# Altium PCB PCI Express Mini L1_V1.PCBDOC (part 5 of 9)
Units mm, origin at the board's own origin, x right, y up, seen from the top; angles counter-clockwise.
Board outline 70 x 83.2 mm, 6 copper layers (TopLayer, Layer 1, Layer 2, Layer 3, Layer 4, Bottom Layer), stack 0.914 mm thick; 442 components, 259 nets, 1412 pads, 857 vias.
Unrouted connection lines stored in the file: 2.
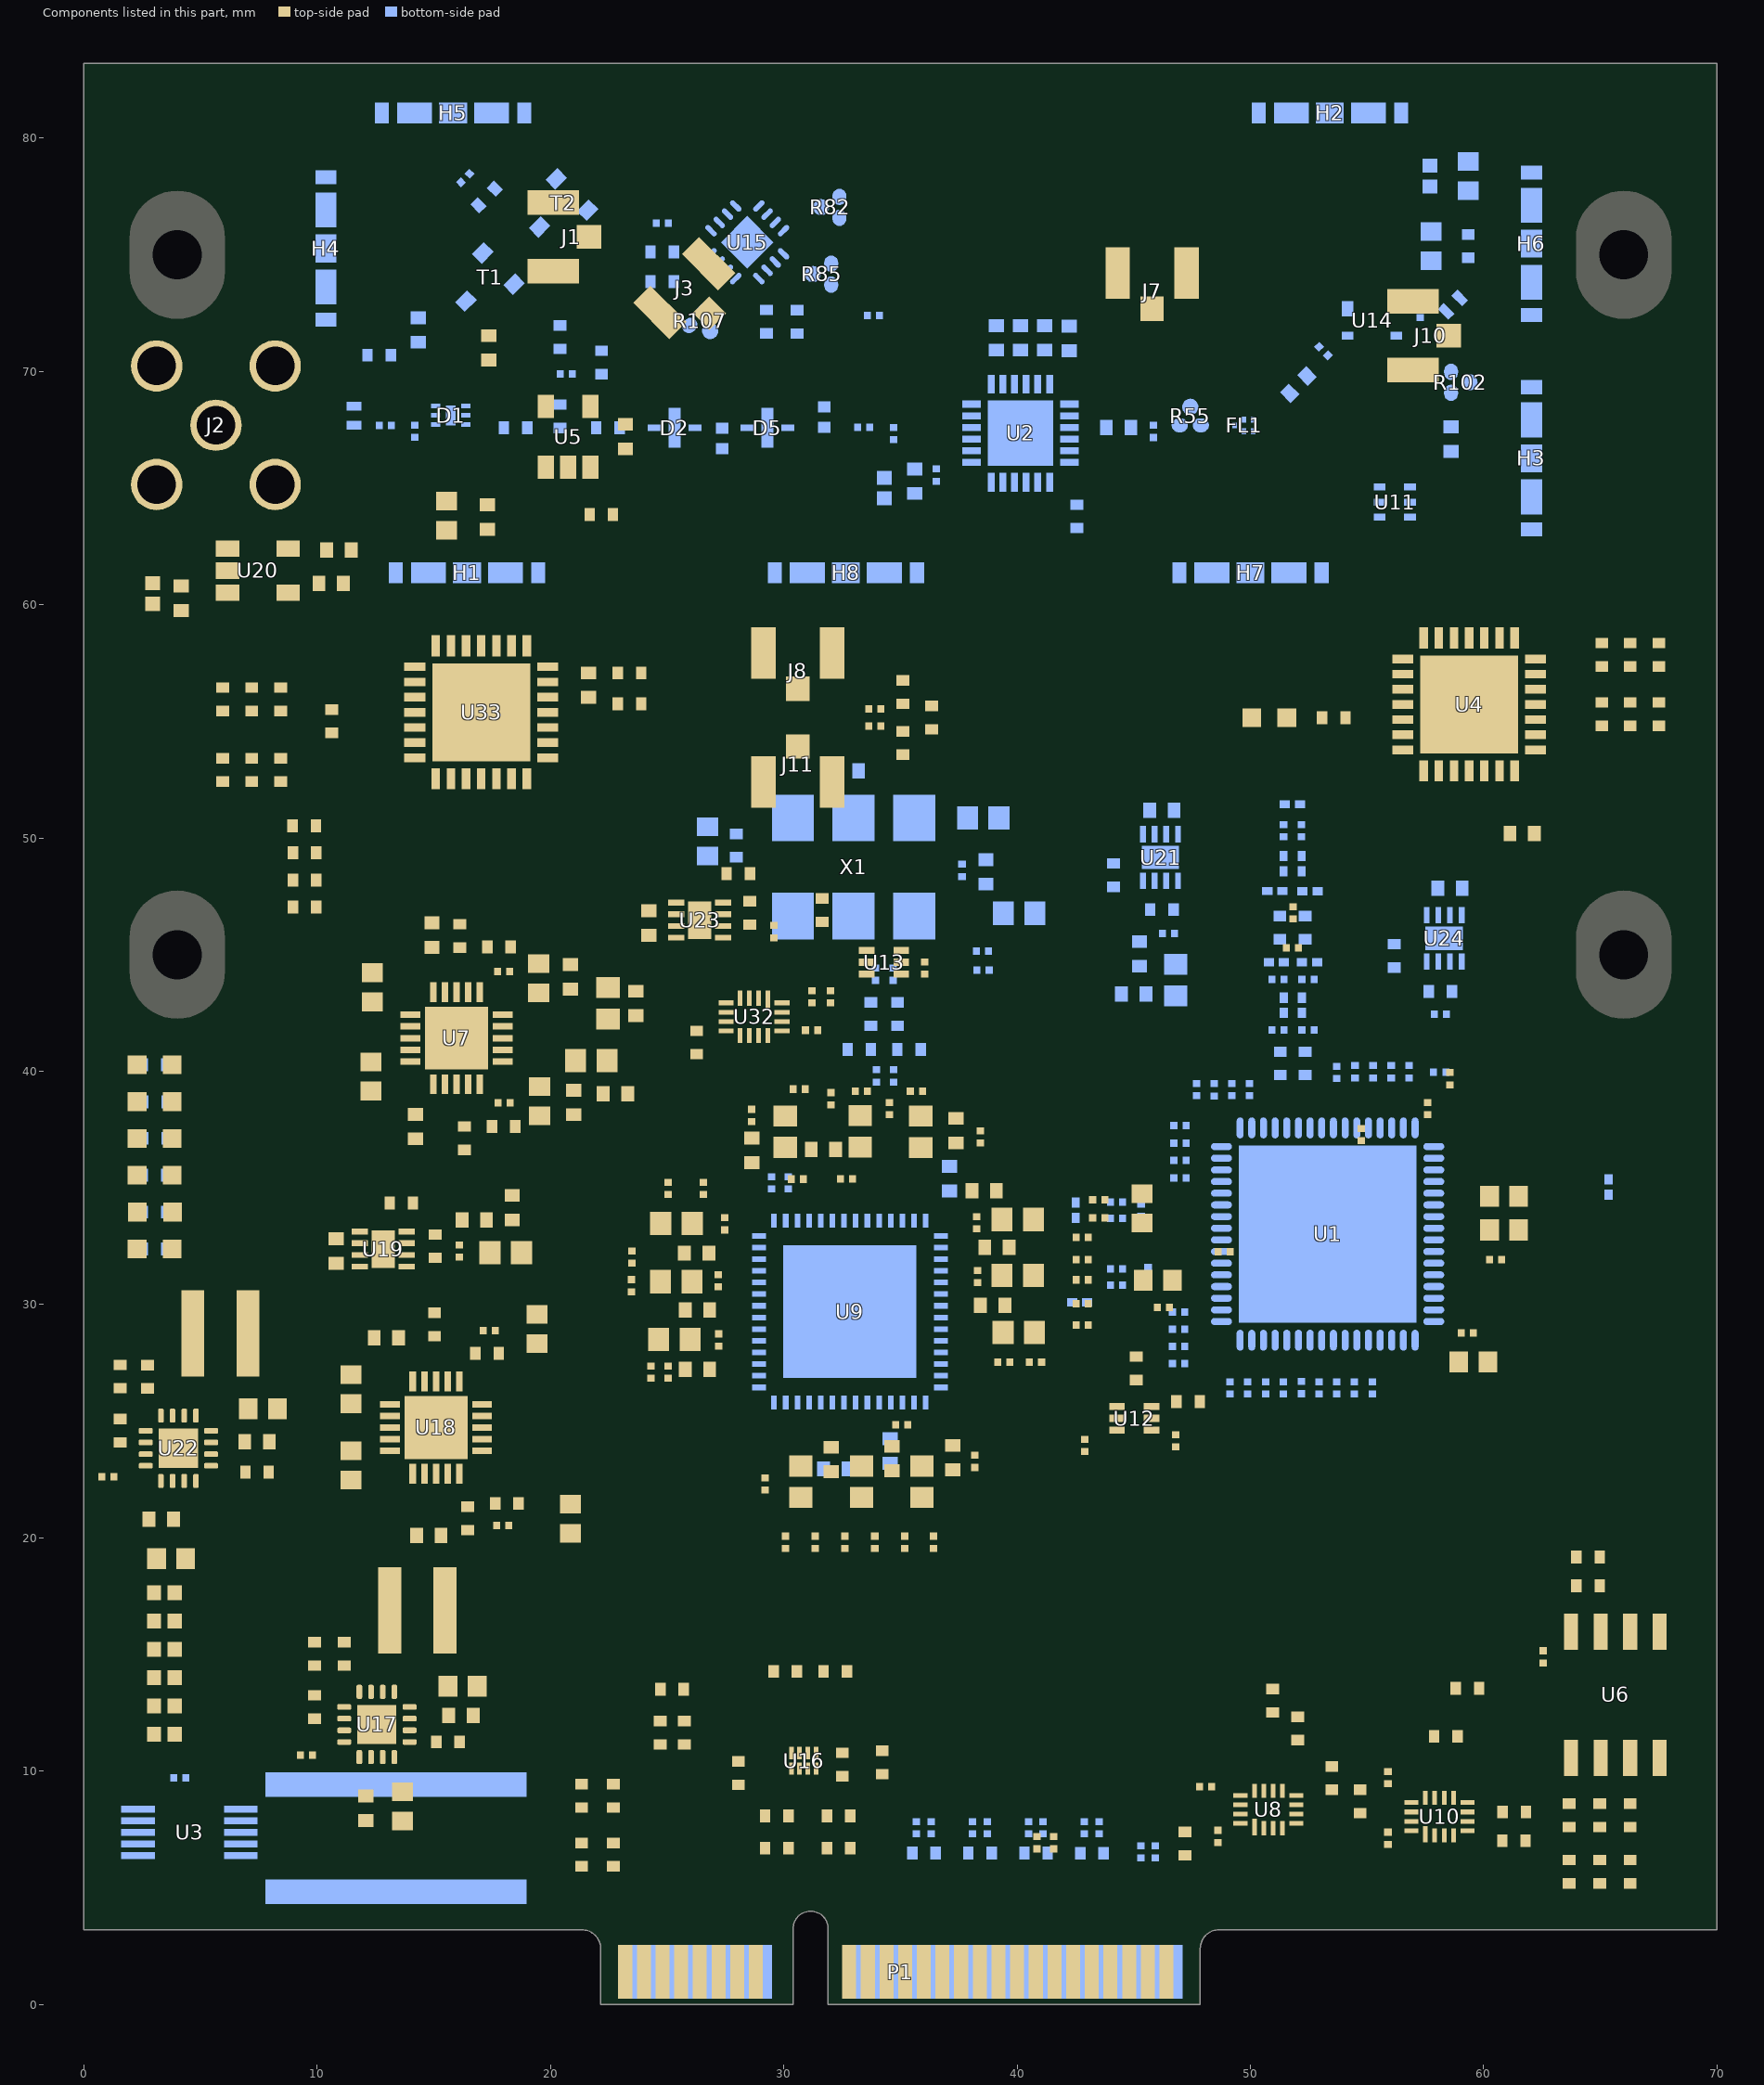
[diagram p6: the components of this part, seen from the top]

## Part data (continued)
R131: library part Resistor, "Res Thick Film 0402 48.7K Ohm 1% 1/16W 100ppm/C Molded SMD Paper T/R", Case Code (Imperial)=0402, Case Code (Metric)=1005, Manufacturer="Stackpole Electronics", Manufacturer Part Number=RMCF0402FT48K7, Max Operating Temperature=155°C, Max Power Dissipation=63mW, Min Operating Temperature=-55°C, Resistor Type="Thick Film", Supplier Part Number 1=RMCF0402FT48K7CT-ND, Temperature Coefficient=100ppm/°C, Tolerance=1%, Case/Package=0402, Category="Chip SMD Resistors", ComponentLink1Description=http://components.arrow.com/part/dataview/50597970S14177N1174?src-supplier=Arrow+Electronics, ComponentLink1URL=http://components.arrow.com/part/dataview/50597970S14177N1174?src-supplier=Arrow+Electronics, ComponentLink2Description=https://www.seielect.com/Catalog/SEI-RMCF_RMCP.pdf?src-supplier=Digi-Key, ComponentLink2URL=https://www.seielect.com/Catalog/SEI-RMCF_RMCP.pdf?src-supplier=Digi-Key, ComponentLink3Description=https://www.seielect.com/Catalog/SEI-RMCF_RMCP.pdf?src-supplier=Avnet, ComponentLink3URL=https://www.seielect.com/Catalog/SEI-RMCF_RMCP.pdf?src-supplier=Avnet, ComponentLink4Description=https://www.seielect.com/catalog/SEI-Packaging.pdf?src-supplier=Digi-Key, ComponentLink4URL=https://www.seielect.com/catalog/SEI-Packaging.pdf?src-supplier=Digi-Key, Contact Plating=Tin,Matte, Features="Automotive AEC-Q200", Height=0.016inch, Lead Free="Lead Free", Length=0.039inch, Mount="Surface Mount", Number of Terminations=2, Packaging="Tape and Reel", Pricing 1="1=0,10000, 10=0,01300, 100=0,00530, 1000=0,00239, 2500=0,00207, 5000=0,00171 (USD)", Resistance=48.7kR, RoHS=Yes, Stock 1=91344, Supplier 1=Digi-Key, Width=0.02inch
T1 T2: "Trans MOSFET N-CH 8V 6A 3-Pin SOT-23 T/R", Case/Package=SOT-23, Continuous Drain Current (ID)=6A, Drain to Source Voltage (Vdss)=8V, Gate to Source Voltage (Vgs)=5V, Input Capacitance=1.07nF, Manufacturer=Vishay, Max Operating Temperature=150°C, Max Power Dissipation=2.5W, Min Operating Temperature=-55°C, Package Quantity=3000, Power Dissipation=1.3W, Supplier Part Number 1=SI2342DS-T1-GE3CT-ND, Threshold Voltage=800mV, Category=MOSFETs, ComponentLink1Description=https://datasheet.ciiva.com/14905/si2342ds-14905257.pdf?src-supplier=Arrow, ComponentLink1URL=https://datasheet.ciiva.com/14905/si2342ds-14905257.pdf?src-supplier=Arrow, ComponentLink2Description=https://datasheet.ciiva.com/29746/si2342ds-29746581.pdf?src-supplier=Digi-Key, ComponentLink2URL=https://datasheet.ciiva.com/29746/si2342ds-29746581.pdf?src-supplier=Digi-Key, ComponentLink3Description=https://datasheet.ciiva.com/30021/si2342ds-30021814.pdf?src-supplier=Avnet, ComponentLink3URL=https://datasheet.ciiva.com/30021/si2342ds-30021814.pdf?src-supplier=Avnet, Contact Plating=Tin,Matte, Fall Time=25ns, Lead Free="Lead Free", Manufacturer Part Number=SI2342DS-T1-GE3, Mount="Surface Mount", Number of Elements=1, Number of Pins=3, Packaging="Tape and Reel", Pricing 1="1=0,50000, 10=0,42500, 25=0,39640, 100=0,29460, 250=0,27984, 500=0,23000, 1000=0,18695 (USD)", Radiation Hardening=No, Rds On Max=17mR, REACH SVHC="No SVHC", Rise Time=14ns, RoHS=Yes, Stock 1=25972, Supplier 1=Digi-Key, Turn-Off Delay Time=65ns, Turn-On Delay Time=6ns
U1: Manufacturer="Analog Devices", Manufacturer Part Number=AD9690BCPZ-500, Max Operating Temperature=85°C, Max Supply Voltage=3.4V, Min Operating Temperature=-40°C, Min Supply Voltage=3.2V, Power Dissipation=1.5W, Supplier Part Number 1=AD9690BCPZ-500-ND, ComponentLink1Description=http://www.mouser.com/ds/2/609/AD9690-534148.pdf?src-supplier=Mouser, ComponentLink1URL=http://www.mouser.com/ds/2/609/AD9690-534148.pdf?src-supplier=Mouser, ComponentLink2Description=http://www.analog.com/media/en/technical-documentation/data-sheets/AD9690.pdf?src-supplier=Digi-Key, ComponentLink2URL=http://www.analog.com/media/en/technical-documentation/data-sheets/AD9690.pdf?src-supplier=Digi-Key, ComponentLink3Description=http://www.farnell.com/datasheets/2146909.pdf?src-supplier=Element14, ComponentLink3URL=http://www.farnell.com/datasheets/2146909.pdf?src-supplier=Element14, ComponentLink4Description=http://www.analog.com/media/en/technical-documentation/data-sheets/AD9690.pdf?src-supplier=Avnet, ComponentLink4URL=http://www.analog.com/media/en/technical-documentation/data-sheets/AD9690.pdf?src-supplier=Avnet, Differential Nonlinearity=0.5LSB, Integral Nonlinearity (INL)=2.5LSB, Interface=Serial, Lead Free="Lead Free", Mount="Surface Mount", Number of A/D Converters=1, Number of Bits=14, Number of Inputs=1, Number of Pins=64, Packaging=Tray, Pricing 1="1 = 199,64000, 10 = 191,20500, 25 = 186,98720 (USD)", REACH SVHC="No SVHC", Resolution=14b, RoHS=Yes, Sampling Rate=500MS/s, Stock 1=6, Supplier 1=Digi-Key, Supply Type=Single
U2: "ANALOG DEVICES   HMC472ALP4E   RF ATTENUATOR, 3.8GHZ, 5.5V, HQFN-24", Attenuation Value=31.5dB, Case/Package=SMD/SMT, Manufacturer="Analog Devices", Max Frequency=3.8GHz, Max Input Voltage=5.5V, Max Operating Temperature=85°C, Max Power Dissipation=560mW, Min Input Voltage=4.5V, Min Operating Temperature=-40°C, Operating Supply Voltage=5V, Package Quantity=50, Supplier Part Number 1=1127-3157-ND, ComponentLink1Description=http://www.mouser.com/ds/2/609/hmc472a-879296.pdf?src-supplier=Mouser, ComponentLink1URL=http://www.mouser.com/ds/2/609/hmc472a-879296.pdf?src-supplier=Mouser, ComponentLink2Description=http://www.analog.com/media/en/technical-documentation/data-sheets/hmc472a.pdf?src-supplier=Avnet+Asia, ComponentLink2URL=http://www.analog.com/media/en/technical-documentation/data-sheets/hmc472a.pdf?src-supplier=Avnet+Asia, ComponentLink3Description=http://www.farnell.com/datasheets/1868224.pdf?src-supplier=Element14, ComponentLink3URL=http://www.farnell.com/datasheets/1868224.pdf?src-supplier=Element14, ComponentLink4Description=https://www.hittite.com/content/documents/data_sheet/hmc472alp4.pdf?src-supplier=Avnet, ComponentLink4URL=https://www.hittite.com/content/documents/data_sheet/hmc472alp4.pdf?src-supplier=Avnet, ComponentLink5Description=https://www.analog.com/media/en/technical-documentation/data-sheets/hmc472a.pdf?src-supplier=Digi-Key, ComponentLink5URL=https://www.analog.com/media/en/technical-documentation/data-sheets/hmc472a.pdf?src-supplier=Digi-Key, Contact Plating=Tin,Matte, Impedance=50R, Insertion Loss=3dB, Lead Free="Contains Lead", Manufacturer Part Number=HMC472ALP4E, Max Supply Voltage=5.5V, Min Supply Voltage=4.5V, Mount="Surface Mount", Number of Bits=6, Number of Channels=1, Number of Pins=24, Packaging="Cut Tape", Pricing 1="1 = 7,47000, 10 = 6,84400, 25 = 6,22160, 100 = 5,59940, 250 = 5,13284, 500 = 4,66620, 1000 = 4,19958 (USD)", REACH SVHC="No SVHC", RoHS=Yes, Stock 1=867, Supplier 1=Digi-Key
U3: "IC MONITOR PWR/CURR BIDIR 10MSOP", Case/Package=VSSOP, Input Bias Current=10uA, Input Offset Voltage (Vos)=2.5uV, Manufacturer="Texas Instruments", Max Operating Temperature=125°C, Max Supply Voltage=5.5V, Min Operating Temperature=-40°C, Min Supply Voltage=2.7V, Nominal Supply Current=330uA, Output Current=10mA, Package Quantity=1, Supplier Part Number 1=296-29034-1-ND, Accuracy=0.02%, Common Mode Rejection Ratio=140dB, ComponentLink1Description=https://datasheet.ciiva.com/1939/ina226-1939633.pdf?src-supplier=Digi-Key, ComponentLink1URL=https://datasheet.ciiva.com/1939/ina226-1939633.pdf?src-supplier=Digi-Key, ComponentLink2Description=https://datasheet.ciiva.com/4875/sbos547-126280-4875559.pdf?src-supplier=Mouser, ComponentLink2URL=https://datasheet.ciiva.com/4875/sbos547-126280-4875559.pdf?src-supplier=Mouser, ComponentLink3Description=https://datasheet.ciiva.com/1939/ina226-1939634.pdf?src-supplier=Digi-Key, ComponentLink3URL=https://datasheet.ciiva.com/1939/ina226-1939634.pdf?src-supplier=Digi-Key, ComponentLink4Description=https://datasheet.ciiva.com/1939/ina226-1939635.pdf?src-supplier=Digi-Key, ComponentLink4URL=https://datasheet.ciiva.com/1939/ina226-1939635.pdf?src-supplier=Digi-Key, ComponentLink5Description=https://datasheet.ciiva.com/14196/ina226-14196741.pdf?src-supplier=Avnet, ComponentLink5URL=https://datasheet.ciiva.com/14196/ina226-14196741.pdf?src-supplier=Avnet, ComponentLink6Description=https://datasheet.ciiva.com/22693/1840205-22693516.pdf?src-supplier=Element14, ComponentLink6URL=https://datasheet.ciiva.com/22693/1840205-22693516.pdf?src-supplier=Element14, Contact Plating=Gold, Lead Free="Lead Free", Manufacturer Part Number=INA226AIDGSR, Mount="Surface Mount", Number of Pins=10, Packaging="Tape and Reel", Pricing 1="1 = 2,88000, 10 = 2,58900, 100 = 2,12100, 500 = 1,80554, 1000 = 1,52275 (USD)", Radiation Hardening=No, REACH SVHC="No SVHC", RoHS=Yes, Stock 1=62024, Supplier 1=Digi-Key
U4 U33: "IC I/O EXPANDER I2C 16B 28QFN", Case/Package=QFN, Frequency=1.7MHz, Manufacturer=Microchip, Max Operating Temperature=125°C, Min Operating Temperature=-40°C, Operating Supply Voltage=5.5V, Output Current=25mA, Package Quantity=1600, Power Dissipation=700mW, Supplier Part Number 1=MCP23017T-E/MLCT-ND, ComponentLink1Description=https://datasheet.ciiva.com/1780/21952b-1780757.pdf?src-supplier=Digi-Key, ComponentLink1URL=https://datasheet.ciiva.com/1780/21952b-1780757.pdf?src-supplier=Digi-Key, ComponentLink2Description=https://datasheet.ciiva.com/16454/filehandler-aspxddocname-en023709-16454263.pdf?src-supplier=Future+Electronics, ComponentLink2URL=https://datasheet.ciiva.com/16454/filehandler-aspxddocname-en023709-16454263.pdf?src-supplier=Future+Electronics, ComponentLink3Description=https://datasheet.ciiva.com/8128/21952b-8128584.pdf?src-supplier=Avnet, ComponentLink3URL=https://datasheet.ciiva.com/8128/21952b-8128584.pdf?src-supplier=Avnet, Contact Plating=Tin,Matte, Interface=I2C,Serial, Lead Free="Lead Free", Manufacturer Part Number=MCP23017T-E/ML, Max Frequency=1.7MHz, Number of Bits=16, Number of I/Os=16, Packaging="Tape and Reel", Pricing 1="1 = 1,45000, 25 = 1,21560, 100 = 1,10210 (USD)", RoHS=Yes, Stock 1=7016, Supplier 1=Digi-Key
U5 U20: "IC REG LINEAR 5V 300MA SOT23-5", Case/Package=SOT-23-5, Dropout Voltage=250mV, Manufacturer=Diodes, Max Input Voltage=13.2V, Max Operating Temperature=125°C, Max Output Current=300mA, Min Input Voltage=2.5V, Min Operating Temperature=-40°C, Output Voltage=5V, Package Quantity=3000, Power Supply Rejection Ratio (PSRR)=75dB, Quiescent Current=150uA, Supplier Part Number 1=AP2210K-5.0TRG1DICT-ND, Accuracy=1%, Category="Voltage Regulators - Linear", ComponentLink1Description=https://datasheet.ciiva.com/29569/ap2210-29569974.pdf?src-supplier=Digi-Key, ComponentLink1URL=https://datasheet.ciiva.com/29569/ap2210-29569974.pdf?src-supplier=Digi-Key, ComponentLink2Description=https://datasheet.ciiva.com/29569/ap2210-29569975.pdf?src-supplier=Digi-Key, ComponentLink2URL=https://datasheet.ciiva.com/29569/ap2210-29569975.pdf?src-supplier=Digi-Key, ComponentLink3Description=https://datasheet.ciiva.com/29569/ap2210-29569976.pdf?src-supplier=Digi-Key, ComponentLink3URL=https://datasheet.ciiva.com/29569/ap2210-29569976.pdf?src-supplier=Digi-Key, Lead Free="Lead Free", Manufacturer Part Number=AP2210K-5.0TRG1, Mount="Surface Mount", Number of Outputs=1, Number of Pins=5, Number of Regulators=1, Output Current=300mA, Output Type=Fixed, Packaging="Tape and Reel", Polarity=Positive, Pricing 1="1=0,42000, 10=0,34200, 25=0,31280, 100=0,21090, 250=0,17452, 500=0,15998, 1000=0,11999 (USD)", RoHS=Yes, Stock 1=36767, Supplier 1=Digi-Key, Weight=0.001058oz
U6: "Microchip 24LC32AT-I/SN Serial EEPROM Memory, 32kbit, 1000ns, 2.5  5.5 V 8-Pin SOIC", Case/Package=SOIC, Frequency=400kHz, Manufacturer=Microchip, Max Operating Temperature=85°C, Max Supply Voltage=5.5V, Min Operating Temperature=-40°C, Min Supply Voltage=2.5V, Nominal Supply Current=3mA, Package Quantity=3300, Supplier Part Number 1=24LC32AT-I/SNCT-ND, Access Time=900ns, Category=EEPROM, ComponentLink1Description=https://datasheet.ciiva.com/1165/1669362-1165104.pdf?src-supplier=Newark, ComponentLink1URL=https://datasheet.ciiva.com/1165/1669362-1165104.pdf?src-supplier=Newark, ComponentLink2Description=https://datasheet.ciiva.com/15123/getdatasheetpartid-768552-15123863.pdf?src-supplier=Verical, ComponentLink2URL=https://datasheet.ciiva.com/15123/getdatasheetpartid-768552-15123863.pdf?src-supplier=Verical, ComponentLink3Description=https://datasheet.ciiva.com/14134/24aa32a-24lc32a-eng-tds-14134838.pdf?src-supplier=Distrelec, ComponentLink3URL=https://datasheet.ciiva.com/14134/24aa32a-24lc32a-eng-tds-14134838.pdf?src-supplier=Distrelec, ComponentLink4Description=https://datasheet.ciiva.com/8059/1669362-8059144.pdf?src-supplier=Element14, ComponentLink4URL=https://datasheet.ciiva.com/8059/1669362-8059144.pdf?src-supplier=Element14, ComponentLink5Description=https://datasheet.ciiva.com/3184/21713l-3184953.pdf?src-supplier=Avnet, ComponentLink5URL=https://datasheet.ciiva.com/3184/21713l-3184953.pdf?src-supplier=Avnet, ComponentLink6Description=https://datasheet.ciiva.com/17651/21713l-17651374.pdf?src-supplier=Avnet+Europe, ComponentLink6URL=https://datasheet.ciiva.com/17651/21713l-17651374.pdf?src-supplier=Avnet+Europe, Contact Plating=Tin,Matte, Density=32Kb, Height=1.5mm, Interface=I2C,Serial,2-Wire, Lead Free="Lead Free", Length=4.9mm, Manufacturer Part Number=24LC32AT-I/SN, Max Frequency=400kHz, Memory Size=32Kb, Memory Type=EEPROM, Mount="Surface Mount", Number of Pins=8, Number of Words=4, Packaging="Tape and Reel", Pricing 1="1=0,34000, 25=0,33000, 100=0,31000 (USD)", Radiation Hardening=No, REACH SVHC="No SVHC", RoHS=Yes, Stock 1=9460, Supplier 1=Digi-Key, Width=3.9mm
U7 U18: "IC REG LINEAR POS ADJ 1A 20QFN", Case/Package=QFN, Dropout Voltage=130mV, Manufacturer="Texas Instruments", Max Operating Temperature=125°C, Min Current Limit=1.5A, Min Operating Temperature=-40°C, Output Current=1A, Output Voltage=5V, Quiescent Current=2mA, Supplier Part Number 1=296-43312-1-ND, Category="Voltage References", ComponentLink1Description=http://www.ti.com/lit/gpn/tps7a88?src-supplier=Mouser, ComponentLink1URL=http://www.ti.com/lit/gpn/tps7a88?src-supplier=Mouser, ComponentLink2Description=http://www.ti.com/lit/ds/symlink/tps7a88.pdf?src-supplier=Digi-Key, ComponentLink2URL=http://www.ti.com/lit/ds/symlink/tps7a88.pdf?src-supplier=Digi-Key, ComponentLink3Description=http://www.ti.com/general/docs/lit/getliterature.tsp?genericPartNumber=TPS7A88&amp;&amp;fileType=pdf&src-supplier=Farnell, ComponentLink3URL=http://www.ti.com/general/docs/lit/getliterature.tsp?genericPartNumber=TPS7A88&amp;&amp;fileType=pdf&src-supplier=Farnell, Lead Free="Lead Free", Manufacturer Part Number=TPS7A8801RTJT, Mount="Surface Mount", Number of Outputs=2, Number of Pins=20, Number of Regulators=2, Packaging="Tape and Reel", Pricing 1="1=2,77000, 10=2,48700, 25=2,34600, 100=1,87670 (USD)", RoHS=Yes, Stock 1=1455, Supplier 1=Digi-Key
U8 U10: "4-bit dual-supply bus transceiver with 3-state outputs and independent direction control inputs 16-UQFN -40 to 125", Manufacturer="Texas Instruments", Supplier Part Number 1=296-SN74AXC4T774RSVRCT-ND, Category="Buffers, Drivers and Transceivers", Manufacturer Part Number=SN74AXC4T774RSVR, Pricing 1="1=1,21000, 10=1,08600, 25=1,03040, 100=0,84640, 250=0,79120, 500=0,69920, 1000=0,55200 (USD)", RoHS=No, Stock 1=2179, Supplier 1=Digi-Key
U9: Manufacturer="Texas Instruments", Max Operating Temperature=85°C, Min Operating Temperature=-40°C, Supplier Part Number 1=296-51339-1-ND, Manufacturer Part Number=LMK04610RTQR, Number of Inputs=2, Number of Outputs=10, Pricing 1="1 = 20,47000, 10 = 18,87700, 100 = 16,11940, 500 = 14,63474 (USD)", RoHS=No, Stock 1=2022, Supplier 1=Digi-Key
U11: "BALUN 625MHZ-2.8GHZ 50/100 0805", Case Code (Imperial)=0805, Case Code (Metric)=2012, Manufacturer=Johanson, Supplier Part Number 1=712-1592-1-ND, Case/Package=0805, ComponentLink1Description=http://www.mouser.com/ds/2/611/1720BL15A0100-910138.pdf?src-supplier=Mouser, ComponentLink1URL=http://www.mouser.com/ds/2/611/1720BL15A0100-910138.pdf?src-supplier=Mouser, ComponentLink2Description=https://www.johansontechnology.com/datasheets/baluns/1720BL15A0100.pdf?src-supplier=Digi-Key, ComponentLink2URL=https://www.johansontechnology.com/datasheets/baluns/1720BL15A0100.pdf?src-supplier=Digi-Key, ComponentLink3Description=https://www.johansontechnology.com/datasheets/1720BL15A0100/1720BL15A0100.pdf?src-supplier=Digi-Key, ComponentLink3URL=https://www.johansontechnology.com/datasheets/1720BL15A0100/1720BL15A0100.pdf?src-supplier=Digi-Key, Manufacturer Part Number=1720BL15A0100E, Mount="Surface Mount", Packaging="Tape and Reel", Pricing 1="1=0,64000, 10=0,62500, 25=0,41840, 50=0,37240, 100=0,34110, 250=0,30600, 500=0,29962, 1000=0,21675 (USD)", RoHS=Yes, Stock 1=10440, Supplier 1=Digi-Key
U12 U13: "TXB0101 (LVC1T55) DRLT Setup", Case/Package=SOT-553-6, High Level Output Current=-20uA, Low Level Output Current=20uA, Manufacturer="Texas Instruments", Max Operating Temperature=85°C, Max Supply Voltage=5.5V, Min Operating Temperature=-40°C, Min Supply Voltage=1.65V, Package Quantity=1, Supplier Part Number 1=296-32600-1-ND, Category="Integrated Circuits (ICs)", ComponentLink1Description=https://datasheet.ciiva.com/15096/getdatasheetpartid-539440-15096428.pdf?src-supplier=Verical, ComponentLink1URL=https://datasheet.ciiva.com/15096/getdatasheetpartid-539440-15096428.pdf?src-supplier=Verical, ComponentLink2Description=https://datasheet.ciiva.com/6615/txb0101-6615081.pdf?src-supplier=Digi-Key, ComponentLink2URL=https://datasheet.ciiva.com/6615/txb0101-6615081.pdf?src-supplier=Digi-Key, ComponentLink3Description=https://datasheet.ciiva.com/6615/txb0101-6615083.pdf?src-supplier=Digi-Key, ComponentLink3URL=https://datasheet.ciiva.com/6615/txb0101-6615083.pdf?src-supplier=Digi-Key, ComponentLink4Description=https://datasheet.ciiva.com/6615/txb0101-6615084.pdf?src-supplier=Digi-Key, ComponentLink4URL=https://datasheet.ciiva.com/6615/txb0101-6615084.pdf?src-supplier=Digi-Key, Contact Plating=Gold, Data Rate=100Mbps, Height=0.55mm, Lead Free="Lead Free", Length=1.7mm, Logic Function=Translator, Manufacturer Part Number=TXB0101DRLT, Mount="Surface Mount", Number of Bits=1, Number of Channels=1, Number of Pins=6, Packaging="Tape and Reel", Pricing 1="1=0,56000, 10=0,49500, 25=0,46520, 100=0,37950 (USD)", Propagation Delay=4ns, Radiation Hardening=No, RoHS=Yes, Stock 1=1962, Supplier 1=Digi-Key, Turn-On Delay Time=31ns, Weight=9.9E-05oz, Width=1.3mm
U14: Frequency="DC - 3.5GHz", Supplier Part Number 1=BGA616H6327XTSA1CT-ND, Supplier 1=Digi-Key
U15: "RF Detector 0MHz to 6000MHz 16-Pin LFCSP EP T/R", Manufacturer="Analog Devices", Operating Supply Current=4mA, Supplier Part Number 1=ADL5910ACPZN-R7CT-ND, Category="RF Semiconductors and Devices", ComponentLink1Description=https://www.analog.com/media/en/technical-documentation/data-sheets/ADL5910.pdf?src-supplier=Digi-Key, ComponentLink1URL=https://www.analog.com/media/en/technical-documentation/data-sheets/ADL5910.pdf?src-supplier=Digi-Key, Manufacturer Part Number=ADL5910ACPZN-R7, Number of Pins=16, Packaging="Cut Tape", Pricing 1="1=5,17000, 10=4,64100, 25=4,38760, 100=3,80250, 250=3,60752, 500=3,23700 (USD)", RoHS=No, Stock 1=1503, Supplier 1=Digi-Key
U16: "TEXAS INSTRUMENTS   PCA9306DQER.   IC, SMBus, 5V, X2SON-8", Low Level Output Current=128mA, Manufacturer 1="Texas Instruments", Max Operating Temperature=85°C, Max Supply Voltage=5V, Min Operating Temperature=-40°C, Min Supply Voltage=0uV, Package Quantity=1, Supplier Part Number 1=296-27957-1-ND, ComponentLink1Description=https://datasheet.ciiva.com/22631/1719693-22631024.pdf?src-supplier=Element14, ComponentLink1URL=https://datasheet.ciiva.com/22631/1719693-22631024.pdf?src-supplier=Element14, ComponentLink2Description=https://datasheet.ciiva.com/1899/pca9306-1899328.pdf?src-supplier=Digi-Key, ComponentLink2URL=https://datasheet.ciiva.com/1899/pca9306-1899328.pdf?src-supplier=Digi-Key, ComponentLink3Description=https://datasheet.ciiva.com/15095/getdatasheetpartid-306496-15095555.pdf?src-supplier=Verical, ComponentLink3URL=https://datasheet.ciiva.com/15095/getdatasheetpartid-306496-15095555.pdf?src-supplier=Verical, ComponentLink4Description=https://datasheet.ciiva.com/1504/1862428-1504149.pdf?src-supplier=Element14, ComponentLink4URL=https://datasheet.ciiva.com/1504/1862428-1504149.pdf?src-supplier=Element14, ComponentLink5Description=https://datasheet.ciiva.com/1899/pca9306-1899326.pdf?src-supplier=Digi-Key, ComponentLink5URL=https://datasheet.ciiva.com/1899/pca9306-1899326.pdf?src-supplier=Digi-Key, ComponentLink6Description=https://datasheet.ciiva.com/14287/pca9306-14287374.pdf?src-supplier=Avnet, ComponentLink6URL=https://datasheet.ciiva.com/14287/pca9306-14287374.pdf?src-supplier=Avnet, ComponentLink7Description=https://datasheet.ciiva.com/14287/pca9306-14287470.pdf?src-supplier=Avnet, ComponentLink7URL=https://datasheet.ciiva.com/14287/pca9306-14287470.pdf?src-supplier=Avnet, ComponentLink8Description=https://datasheet.ciiva.com/1899/pca9306-1899327.pdf?src-supplier=Digi-Key, ComponentLink8URL=https://datasheet.ciiva.com/1899/pca9306-1899327.pdf?src-supplier=Digi-Key, ComponentLink9Description=https://datasheet.ciiva.com/26041/pca9306-26041014.pdf?src-supplier=Avnet+Europe, ComponentLink9URL=https://datasheet.ciiva.com/26041/pca9306-26041014.pdf?src-supplier=Avnet+Europe, Height=0.35mm, Lead Free="Lead Free", Length=1.45mm, Logic Function=Translator, Manufacturer Part Number 1=PCA9306DQER, Number of Bits=2, Number of Channels=2, Number of Outputs=2, Number of Pins=8, Output Type=I2C, Packaging="Tape and Reel", Pricing 1="1=0,67000, 10=0,59100, 100=0,45340, 500=0,35844, 1000=0,28675 (USD)", Propagation Delay=0.3ns, Radiation Hardening=No, REACH SVHC="No SVHC", RoHS=Yes, Stock 1=25002, Supplier 1=Digi-Key, Turn-On Delay Time=1.4ns, Width=1.05mm